# Altium PCB PWB.PcbDoc (part 5 of 5)
Units mm, origin at the board's own origin, x right, y up, seen from the top; angles counter-clockwise.
Board outline 202 x 125 mm, 2 copper layers (Top Layer, Bottom Layer), stack 1.576 mm thick; 208 components, 124 nets, 630 pads, 5440 vias.
Unrouted connection lines stored in the file: 98.
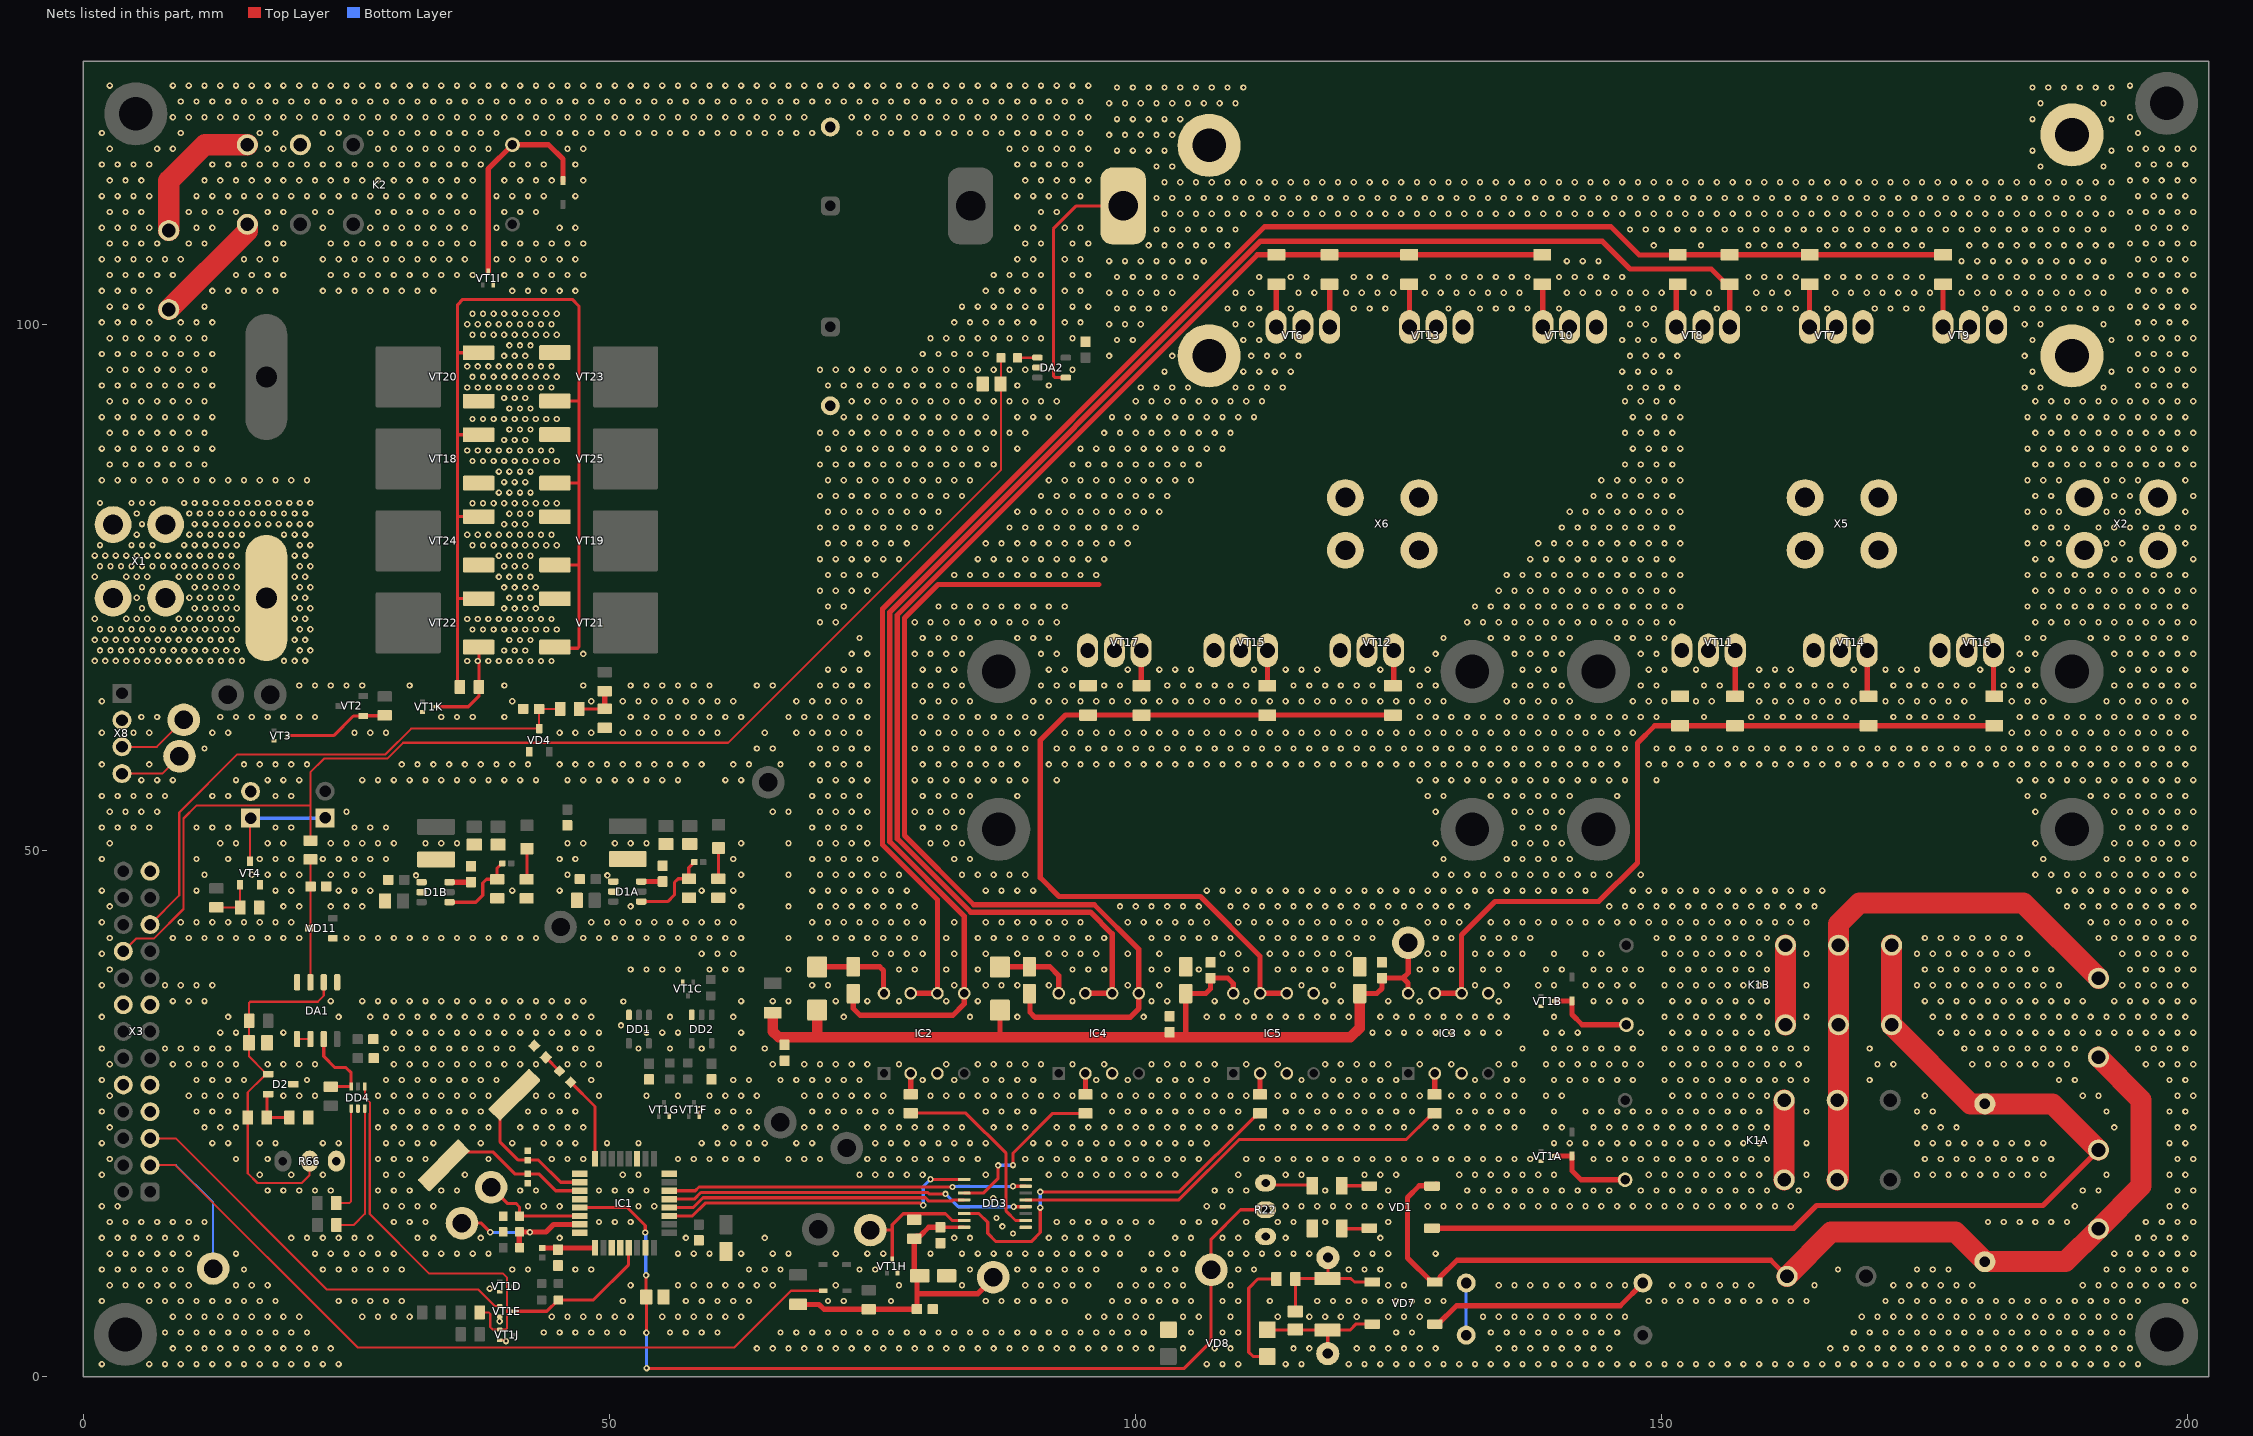
[diagram p4: the nets of this part, all layers, seen from the top]

## Via types
v1: diameter 0.6, hole 0.3, Top Layer to Bottom Layer, tented both sides, 5432 vias
v2: diameter 0.8, hole 0.4, Top Layer to Bottom Layer, tented both sides, 8 vias

## Nets (pads, with @x,y where several pads share a name; then routed paths per layer and width w, separated by ;. In a path a pad name is that pad's centre, name@x,y a point inside that pad or via, vN(x,y) a via of type N, cw(c..) or ccw(c..) an arc to the next point about the centre after c; other vN are vias at no path point) (continued)
GND: (continued)
  other v1: 94.022,101.68 95.522,101.68 194.522,101.68 196.022,101.68 197.522,101.68 199.022,101.68 200.522,101.68 1.772,103.18 3.272,103.18 4.772,103.18 6.272,103.18 12.272,103.18 13.772,103.18 15.272,103.18 16.772,103.18 18.272,103.18 22.772,103.18 24.272,103.18 25.772,103.18 27.272,103.18 28.772,103.18 30.272,103.18 31.772,103.18 33.272,103.18 40.772,103.18 42.272,103.18 43.772,103.18 45.272,103.18 46.772,103.18 85.772,103.18 87.272,103.18 88.772,103.18 90.272,103.18 93.272,103.18 94.772,103.18 195.272,103.18 196.772,103.18 198.272,103.18 199.772,103.18 2.522,104.68 4.022,104.68 5.522,104.68 7.022,104.68 8.522,104.68 14.522,104.68 16.022,104.68 17.522,104.68 19.022,104.68 23.522,104.68 25.022,104.68 26.522,104.68 28.022,104.68 29.522,104.68 31.022,104.68 32.522,104.68 34.022,104.68 35.522,104.68 37.022,104.68 40.022,104.68 41.522,104.68 43.022,104.68 44.522,104.68 46.022,104.68 47.522,104.68 86.522,104.68 88.022,104.68 89.522,104.68 91.022,104.68 94.022,104.68 95.522,104.68 194.522,104.68 196.022,104.68 197.522,104.68 199.022,104.68 200.522,104.68 1.772,106.18 3.272,106.18 4.772,106.18 6.272,106.18 7.772,106.18 9.272,106.18 15.272,106.18 16.772,106.18 18.272,106.18 22.772,106.18 24.272,106.18 25.772,106.18 27.272,106.18 28.772,106.18 30.272,106.18 31.772,106.18 33.272,106.18 34.772,106.18 36.272,106.18 39.272,106.18 40.772,106.18 42.272,106.18 43.772,106.18 45.272,106.18 46.772,106.18 88.772,106.18 90.272,106.18 93.272,106.18 94.772,106.18 195.272,106.18 196.772,106.18 198.272,106.18 199.772,106.18 2.522,107.68 4.022,107.68 5.522,107.68 7.022,107.68 10.022,107.68 11.522,107.68 17.522,107.68 19.022,107.68 23.522,107.68 25.022,107.68 26.522,107.68 28.022,107.68 29.522,107.68 31.022,107.68 32.522,107.68 34.022,107.68 35.522,107.68 37.022,107.68 40.022,107.68 41.522,107.68 43.022,107.68 44.522,107.68 46.022,107.68 47.522,107.68 89.522,107.68 91.022,107.68 94.022,107.68 95.522,107.68 194.522,107.68 196.022,107.68 197.522,107.68 199.022,107.68 200.522,107.68 1.772,109.18 3.272,109.18 4.772,109.18 6.272,109.18 10.772,109.18 12.272,109.18 18.272,109.18 22.772,109.18 27.272,109.18 28.772,109.18 30.272,109.18 31.772,109.18 33.272,109.18 34.772,109.18 36.272,109.18 39.272,109.18 45.272,109.18 46.772,109.18 88.772,109.18 90.272,109.18 93.272,109.18 94.772,109.18 195.272,109.18 196.772,109.18 198.272,109.18 199.772,109.18 2.522,110.68 4.022,110.68 5.522,110.68 10.022,110.68 11.522,110.68 13.022,110.68 14.522,110.68 17.522,110.68 19.022,110.68 22.022,110.68 23.522,110.68 28.022,110.68 29.522,110.68 31.022,110.68 32.522,110.68 34.022,110.68 35.522,110.68 37.022,110.68 40.022,110.68 41.522,110.68 43.022,110.68 91.022,110.68 92.522,110.68 194.522,110.68 196.022,110.68 197.522,110.68 199.022,110.68 200.522,110.68 1.772,112.18 3.272,112.18 4.772,112.18 6.272,112.18 10.772,112.18 12.272,112.18 13.772,112.18 15.272,112.18 16.772,112.18 18.272,112.18 19.772,112.18 21.272,112.18 22.772,112.18 24.272,112.18 25.772,112.18 27.272,112.18 28.772,112.18 30.272,112.18 31.772,112.18 33.272,112.18 34.772,112.18 36.272,112.18 39.272,112.18 40.772,112.18 42.272,112.18 43.772,112.18 46.772,112.18 88.772,112.18 90.272,112.18 91.772,112.18 93.272,112.18 94.772,112.18 195.272,112.18 196.772,112.18 198.272,112.18 199.772,112.18 2.522,113.68 4.022,113.68 5.522,113.68 11.522,113.68 13.022,113.68 14.522,113.68 16.022,113.68 17.522,113.68 19.022,113.68 20.522,113.68 22.022,113.68 23.522,113.68 25.022,113.68 26.522,113.68 28.022,113.68 29.522,113.68 31.022,113.68 32.522,113.68 34.022,113.68 35.522,113.68 37.022,113.68 40.022,113.68 41.522,113.68 43.022,113.68 44.522,113.68 47.522,113.68 89.522,113.68 91.022,113.68 92.522,113.68 94.022,113.68 95.522,113.68 194.522,113.68 196.022,113.68 197.522,113.68 199.022,113.68 200.522,113.68 1.772,115.18 3.272,115.18 4.772,115.18 6.272,115.18 12.272,115.18 13.772,115.18 15.272,115.18 16.772,115.18 18.272,115.18 19.772,115.18 21.272,115.18 22.772,115.18 24.272,115.18 25.772,115.18 27.272,115.18 28.772,115.18 30.272,115.18 31.772,115.18 33.272,115.18 34.772,115.18 36.272,115.18 37.772,115.18 40.772,115.18 42.272,115.18 43.772,115.18 46.772,115.18 88.772,115.18 90.272,115.18 91.772,115.18 93.272,115.18 94.772,115.18 195.272,115.18 196.772,115.18 198.272,115.18 199.772,115.18 2.522,116.68 7.022,116.68 8.522,116.68 17.522,116.68 19.022,116.68 23.522,116.68 28.022,116.68 29.522,116.68 31.022,116.68 32.522,116.68 34.022,116.68 35.522,116.68 37.022,116.68 38.522,116.68 46.022,116.68 47.522,116.68 88.022,116.68 89.522,116.68 91.022,116.68 92.522,116.68 94.022,116.68 95.522,116.68 194.522,116.68 196.022,116.68 197.522,116.68 199.022,116.68 200.522,116.68 1.772,118.18 9.272,118.18 16.772,118.18 18.272,118.18 22.772,118.18 24.272,118.18 27.272,118.18 28.772,118.18 30.272,118.18 31.772,118.18 33.272,118.18 34.772,118.18 36.272,118.18 37.772,118.18 39.272,118.18 42.272,118.18 43.772,118.18 45.272,118.18 46.772,118.18 48.272,118.18 49.772,118.18 51.272,118.18 52.772,118.18 54.272,118.18 55.772,118.18 57.272,118.18 58.772,118.18 60.272,118.18 61.772,118.18 63.272,118.18 64.772,118.18 66.272,118.18 67.772,118.18 69.272,118.18 73.772,118.18 75.272,118.18 76.772,118.18 78.272,118.18 79.772,118.18 81.272,118.18 82.772,118.18 84.272,118.18 85.772,118.18 87.272,118.18 88.772,118.18 90.272,118.18 91.772,118.18 93.272,118.18 94.772,118.18 195.272,118.18 8.522,119.68 10.022,119.68 11.522,119.68 13.022,119.68 14.522,119.68 16.022,119.68 17.522,119.68 19.022,119.68 20.522,119.68 22.022,119.68 23.522,119.68 25.022,119.68 26.522,119.68 28.022,119.68 29.522,119.68 31.022,119.68 32.522,119.68 34.022,119.68 35.522,119.68 37.022,119.68 38.522,119.68 40.022,119.68 41.522,119.68 43.022,119.68 44.522,119.68 46.022,119.68 47.522,119.68 49.022,119.68 50.522,119.68 52.022,119.68 53.522,119.68 55.022,119.68 56.522,119.68 58.022,119.68 59.522,119.68 61.022,119.68 62.522,119.68 64.022,119.68 65.522,119.68 67.022,119.68 68.522,119.68 73.022,119.68 74.522,119.68 76.022,119.68 77.522,119.68 79.022,119.68 80.522,119.68 82.022,119.68 83.522,119.68 85.022,119.68 86.522,119.68 88.022,119.68 89.522,119.68 91.022,119.68 92.522,119.68 94.022,119.68 95.522,119.68 194.522,119.68 9.272,121.18 10.772,121.18 12.272,121.18 13.772,121.18 15.272,121.18 16.772,121.18 18.272,121.18 19.772,121.18 21.272,121.18 22.772,121.18 24.272,121.18 25.772,121.18 27.272,121.18 28.772,121.18 30.272,121.18 31.772,121.18 33.272,121.18 34.772,121.18 36.272,121.18 37.772,121.18 39.272,121.18 40.772,121.18 42.272,121.18 43.772,121.18 45.272,121.18 46.772,121.18 48.272,121.18 49.772,121.18 51.272,121.18 52.772,121.18 54.272,121.18 55.772,121.18 57.272,121.18 58.772,121.18 60.272,121.18 61.772,121.18 63.272,121.18 64.772,121.18 66.272,121.18 67.772,121.18 69.272,121.18 70.772,121.18 72.272,121.18 73.772,121.18 75.272,121.18 76.772,121.18 78.272,121.18 79.772,121.18 81.272,121.18 82.772,121.18 84.272,121.18 85.772,121.18 87.272,121.18 88.772,121.18 90.272,121.18 91.772,121.18 93.272,121.18 94.772,121.18 2.522,122.68 8.522,122.68 10.022,122.68 11.522,122.68 13.022,122.68 14.522,122.68 16.022,122.68 17.522,122.68 19.022,122.68 20.522,122.68 22.022,122.68 23.522,122.68 25.022,122.68 26.522,122.68 28.022,122.68 29.522,122.68 31.022,122.68 32.522,122.68 34.022,122.68 35.522,122.68 37.022,122.68 38.522,122.68 40.022,122.68 41.522,122.68 43.022,122.68 44.522,122.68 46.022,122.68 47.522,122.68 49.022,122.68 50.522,122.68 52.022,122.68 53.522,122.68 55.022,122.68 56.522,122.68 58.022,122.68 59.522,122.68 61.022,122.68 62.522,122.68 64.022,122.68 65.522,122.68 67.022,122.68 68.522,122.68 70.022,122.68 71.522,122.68 73.022,122.68 74.522,122.68 76.022,122.68 77.522,122.68 79.022,122.68 80.522,122.68 82.022,122.68 83.522,122.68 85.022,122.68 86.522,122.68 88.022,122.68 89.522,122.68 91.022,122.68 92.522,122.68 94.022,122.68 95.522,122.68 194.522,122.68
NetC6A_1: C6A.1 D1A.2 L1A.1
NetC6A_2: C6A.2 D1A.6 | length 2
  Top Layer w0.3: D1A.6@53.028,47.036 D1A.6@53.033,47.041 ; C6A.2@55.068,47.041 C6A.2@55.073,47.046
  Top Layer w0.5: D1A.6@53.033,47.041 C6A.2@55.068,47.041
NetC6B_1: C6B.1 D1B.2 L1B.1
NetC6B_2: C6B.2 D1B.6 | length 2
  Top Layer w0.3: D1B.6@34.81,46.981 D1B.6@34.815,46.986 ; C6B.2@36.85,46.986 C6B.2@36.855,46.991
  Top Layer w0.5: D1B.6@34.815,46.986 C6B.2@36.85,46.986
NetC9_2: C9.2 IC1.10 ZQ1.2 | length 14.2
  Top Layer w0.3: ZQ1.2@40.976,26.778 39.597,25.399 39.597,22.328 41.359,20.566 43.264,20.566 45.371,18.459 IC1.10@47.197,18.459
NetC10_1: C10.1 IC1.11 ZQ1.1 | length 15
  Top Layer w0.3: ZQ1.1@34.259,20.06 35.553,21.354 38.92,21.354 41.013,19.261 C10.1@42.24,19.261 43.299,19.261 44.901,17.659 IC1.11@47.197,17.659
NetC11_1: C11.1 FB1.2 IC1.17 | length 4.8
  Top Layer w0.5: FB1.2@43.786,12.212 45.11,12.212 IC1.17@48.625,12.212
NetC22_1: C22.1 IC2.8 VD5.CA | length 8.6
  Top Layer w0.5: VD5.CA@69.748,38.918 69.773,38.943 C22.1@73.177,38.943 75.687,38.943 76.048,38.583 76.048,36.474 IC2.8@76.098,36.424
NetC22_2: C22.2 IC2.5 R41.1 VT7.3 VT8.3 VT9.3 VT11.2 VT14.2 VT16.2 X5.1 | length 153
  Top Layer w0.5: C22.2@73.177,36.393 73.177,34.976 73.812,34.341 82.652,34.341 83.718,35.408 IC2.5@83.718,36.424 83.718,43.766 76.654,50.83 76.654,72.668 111.886,107.899 144.348,107.899 146.99,105.258 154.713,105.258 156.164,103.807 R41.1@156.464,103.807 156.468,103.803 VT8.3@156.468,99.746
NetC25_1: C25.1 IC4.8 VD6.CA | length 7.6
  Top Layer w0.5: VD6.CA@87.122,38.918 87.147,38.943 C25.1@89.916,38.943 91.867,38.943 92.702,38.108 IC4.8@92.702,36.424
NetC25_2: C25.2 IC4.5 R37.1 VT6.3 VT10.3 VT12.2 VT13.3 VT15.2 VT17.2 X6.1 | length 89.6
  Top Layer w0.5: C25.2@89.916,36.393 89.967,36.342 89.967,34.62 90.449,34.138 99.492,34.138 100.322,34.967 IC4.5@100.322,36.424 100.322,40.598 96.088,44.831 84.633,44.831 78.054,51.41 78.054,72.088 81.227,75.26 96.52,75.26 ; R37.1@118.44,103.807 118.452,103.795 VT6.3@118.452,99.746
NetC31_1: C31.1 R60.1 TP1.1 VD7.3 VD10.CA | length 12.6
  Top Layer w0.3: C31.1@115.189,6.184 115.2,6.195 R60.1@115.2,9.271 115.237,9.308 VD10.CA@118.242,9.308 ; TP1.1@118.288,11.303 118.288,9.354 VD10.CA@118.242,9.308 ; VD7.3@122.501,8.985 120.809,8.985 120.486,9.308 VD10.CA@118.242,9.308
NetC31_2: C31.2 TP2.1 VD7.4 VD8.2 VD10.AN | length 12.5
  Top Layer w0.3: VD8.2@112.523,4.445 112.56,4.408 VD10.AN@118.242,4.408 ; TP2.1@118.273,2.181 118.273,4.377 VD10.AN@118.242,4.408 ; VD7.4@122.501,4.985 122.482,5.004 120.98,5.004 120.384,4.408 VD10.AN@118.242,4.408
NetC37_1: C37.1 DA1.3 R18.1 VD11.3 | length 11.7
  Top Layer w0.2: R18.1@21.59,49.138 21.596,49.132 21.596,46.59 C37.1@21.602,46.584 21.596,46.578 21.596,43.575 21.59,43.569 21.59,41.762 21.59,40.975 21.59,37.998 21.641,37.948 DA1.3@21.641,37.473
NetD1A_4: D1A.4 R6A.1 R8.1 | length 8.1
  Top Layer w0.3: D1A.4@53.028,45.136 55.537,45.136 56.191,45.789 56.191,46.958 56.546,47.313 57.548,47.313 57.544,47.318 57.544,48.368 57.921,48.745 R8.1@57.921,48.77 ; R8.1@57.921,48.77 R8.1@58.046,48.895 ; R8.1@57.921,48.77 R8.1@58.046,48.895 ; R8.1@58.046,48.895 R8.1@58.071,48.895 R8.1@58.046,48.895
NetD1B_4: D1B.4 R5.1 R6B.1 | length 7.9
  Top Layer w0.3: D1B.4@34.81,45.081 37.32,45.081 37.973,45.734 37.973,46.902 38.329,47.258 39.33,47.258 39.326,47.262 39.326,48.312 39.703,48.69 39.703,48.715 39.828,48.84 R5.1@39.853,48.84
NetD2_2: D2.2 R20.2 R31.1 | length 4.6
  Top Layer w0.3: D2.2@17.571,26.838 17.458,26.725 17.458,24.763 17.308,24.613 17.458,24.613 R31.1@19.598,24.613
NetDA1_5: DA1.5 DA1.6 | length 1.3
  Top Layer w0.2: DA1.5@20.32,32.073 DA1.6@21.59,32.073
NetDA1_7: DA1.7 DD4.6 R16.2 | length 8.1
  Top Layer w0.3: DA1.7@22.86,32.073 22.86,30.429 23.927,29.362 24.968,29.362 25.461,28.869 DD4.6@25.461,27.568 25.45,27.556 23.532,27.556 R16.2@23.52,27.545
NetDA2_1: DA2.1 R43.1 | length 1.9
  Top Layer w0.2: R43.1@88.804,96.817 DA2.1@90.66,96.817
  Top Layer w0.3: R43.1@88.791,96.805 R43.1@88.786,96.799 R43.1@88.804,96.817 ; DA2.1@90.66,96.817 DA2.1@90.678,96.835
NetDA2_4: DA2.4 pad.0@107,97 pad.0@107,117 pad.0@189,97 pad.0@189,118 SH1.2 VT6.2 VT7.2 VT8.2 VT9.2 VT10.2 VT13.2 | length 22.7
  Top Layer w0.3: DA2.4@93.378,94.935 92.378,94.935 92.202,95.111 92.202,109.068 94.386,111.252 SH1.2@98.828,111.252
  other v1: 100.5,94 102,94 103.5,94 105,94 109.5,94 111,94 112.5,94 114,94 147,94 148.5,94 150,94 151.5,94 184.5,94 186,94 192,94 102.75,95.5 110.25,95.5 111.75,95.5 113.25,95.5 114.75,95.5 146.25,95.5 147.75,95.5 149.25,95.5 150.75,95.5 185.25,95.5 192.75,95.5 97.5,97 103.5,97 111,97 112.5,97 114,97 115.5,97 147,97 148.5,97 150,97 151.5,97 184.5,97 98.25,98.5 99.75,98.5 110.25,98.5 111.75,98.5 146.25,98.5 147.75,98.5 149.25,98.5 185.25,98.5 192.75,98.5 97.5,100 99,100 100.5,100 109.5,100 111,100 147,100 148.5,100 184.5,100 186,100 192,100 98.25,101.5 99.75,101.5 101.25,101.5 102.75,101.5 108.75,101.5 110.25,101.5 111.75,101.5 114.75,101.5 120.75,101.5 122.25,101.5 123.75,101.5 129.75,101.5 132.75,101.5 134.25,101.5 135.75,101.5 137.25,101.5 140.25,101.5 146.25,101.5 147.75,101.5 149.25,101.5 155.25,101.5 158.25,101.5 159.75,101.5 161.25,101.5 162.75,101.5 165.75,101.5 170.25,101.5 171.75,101.5 173.25,101.5 174.75,101.5 180.75,101.5 183.75,101.5 185.25,101.5 186.75,101.5 188.25,101.5 189.75,101.5 191.25,101.5 192.75,101.5 97.5,103 99,103 100.5,103 102,103 103.5,103 109.5,103 111,103 115.5,103 117,103 120,103 121.5,103 123,103 124.5,103 127.5,103 129,103 130.5,103 132,103 133.5,103 135,103 136.5,103 141,103 142.5,103 144,103 145.5,103 147,103 148.5,103 150,103 153,103 154.5,103 159,103 160.5,103 162,103 166.5,103 168,103 169.5,103 171,103 172.5,103 174,103 175.5,103 178.5,103 180,103 181.5,103 183,103 184.5,103 186,103 187.5,103 189,103 190.5,103 192,103 98.25,104.5 99.75,104.5 101.25,104.5 102.75,104.5 104.25,104.5 105.75,104.5 111.75,104.5 114.75,104.5 116.25,104.5 120.75,104.5 122.25,104.5 123.75,104.5 128.25,104.5 129.75,104.5 131.25,104.5 132.75,104.5 134.25,104.5 135.75,104.5 137.25,104.5 140.25,104.5 141.75,104.5 143.25,104.5 144.75,104.5 146.25,104.5 158.25,104.5 159.75,104.5 161.25,104.5 162.75,104.5 165.75,104.5 167.25,104.5 168.75,104.5 170.25,104.5 171.75,104.5 173.25,104.5 174.75,104.5 179.25,104.5 180.75,104.5 182.25,104.5 183.75,104.5 185.25,104.5 186.75,104.5 188.25,104.5 189.75,104.5 191.25,104.5 192.75,104.5 97.5,106 99,106 100.5,106 102,106 103.5,106 105,106 106.5,106 141,106 142.5,106 144,106 178.5,106 180,106 181.5,106 183,106 184.5,106 186,106 187.5,106 189,106 190.5,106 192,106 101.25,107.5 102.75,107.5 104.25,107.5 105.75,107.5 107.25,107.5 108.75,107.5 149.25,107.5 153.75,107.5 158.25,107.5 159.75,107.5 161.25,107.5 162.75,107.5 165.75,107.5 167.25,107.5 168.75,107.5 170.25,107.5 171.75,107.5 173.25,107.5 174.75,107.5 179.25,107.5 180.75,107.5 182.25,107.5 183.75,107.5 185.25,107.5 186.75,107.5 188.25,107.5 189.75,107.5 191.25,107.5 192.75,107.5 102,109 103.5,109 105,109 106.5,109 108,109 109.5,109 147,109 148.5,109 150,109 151.5,109 153,109 154.5,109 156,109 157.5,109 159,109 160.5,109 162,109 163.5,109 165,109 166.5,109 168,109 169.5,109 171,109 172.5,109 174,109 175.5,109 177,109 178.5,109 180,109 181.5,109 183,109 184.5,109 186,109 187.5,109 189,109 190.5,109 192,109 102.75,110.5 104.25,110.5 105.75,110.5 107.25,110.5 108.75,110.5 110.25,110.5 111.75,110.5 113.25,110.5 114.75,110.5 116.25,110.5 117.75,110.5 119.25,110.5 120.75,110.5 122.25,110.5 123.75,110.5 125.25,110.5 126.75,110.5 128.25,110.5 129.75,110.5 131.25,110.5 132.75,110.5 134.25,110.5 135.75,110.5 137.25,110.5 138.75,110.5 140.25,110.5 141.75,110.5 143.25,110.5 144.75,110.5 146.25,110.5 147.75,110.5 149.25,110.5 150.75,110.5 152.25,110.5 153.75,110.5 155.25,110.5 156.75,110.5 158.25,110.5 159.75,110.5 161.25,110.5 162.75,110.5 164.25,110.5 165.75,110.5 167.25,110.5 168.75,110.5 170.25,110.5 171.75,110.5 173.25,110.5 174.75,110.5 176.25,110.5 177.75,110.5 179.25,110.5 180.75,110.5 182.25,110.5 183.75,110.5 185.25,110.5 186.75,110.5 188.25,110.5 189.75,110.5 191.25,110.5 192.75,110.5 102,112 103.5,112 105,112 106.5,112 108,112 109.5,112 111,112 112.5,112 114,112 115.5,112 117,112 118.5,112 120,112 121.5,112 123,112 124.5,112 126,112 127.5,112 129,112 130.5,112 132,112 133.5,112 135,112 136.5,112 138,112 139.5,112 141,112 142.5,112 144,112 145.5,112 147,112 148.5,112 150,112 151.5,112 153,112 154.5,112 156,112 157.5,112 159,112 160.5,112 162,112 163.5,112 165,112 166.5,112 168,112 169.5,112 171,112 172.5,112 174,112 175.5,112 177,112 178.5,112 180,112 181.5,112 183,112 184.5,112 186,112 187.5,112 189,112 190.5,112 192,112 102.75,113.5 104.25,113.5 105.75,113.5 107.25,113.5 108.75,113.5 110.25,113.5 111.75,113.5 113.25,113.5 114.75,113.5 116.25,113.5 117.75,113.5 119.25,113.5 120.75,113.5 122.25,113.5 123.75,113.5 125.25,113.5 126.75,113.5 128.25,113.5 129.75,113.5 131.25,113.5 132.75,113.5 134.25,113.5 135.75,113.5 137.25,113.5 138.75,113.5 140.25,113.5 141.75,113.5 143.25,113.5 144.75,113.5 146.25,113.5 147.75,113.5 149.25,113.5 150.75,113.5 152.25,113.5 153.75,113.5 155.25,113.5 156.75,113.5 158.25,113.5 159.75,113.5 161.25,113.5 162.75,113.5 164.25,113.5 165.75,113.5 167.25,113.5 168.75,113.5 170.25,113.5 171.75,113.5 173.25,113.5 174.75,113.5 176.25,113.5 177.75,113.5 179.25,113.5 180.75,113.5 182.25,113.5 183.75,113.5 185.25,113.5 186.75,113.5 188.25,113.5 189.75,113.5 191.25,113.5 192.75,113.5 102,115 103.5,115 186,115 192,115 98.25,116.5 99.75,116.5 101.25,116.5 102.75,116.5 185.25,116.5 192.75,116.5 97.5,118 99,118 100.5,118 102,118 103.5,118 98.25,119.5 99.75,119.5 101.25,119.5 102.75,119.5 104.25,119.5 185.25,119.5 192.75,119.5 97.5,121 99,121 100.5,121 102,121 103.5,121 105,121 106.5,121 108,121 109.5,121 186,121 192,121 98.25,122.5 99.75,122.5 101.25,122.5 102.75,122.5 104.25,122.5 105.75,122.5 107.25,122.5 108.75,122.5 110.25,122.5 185.25,122.5 186.75,122.5 188.25,122.5 189.75,122.5 191.25,122.5 192.75,122.5
NetDD3_2: DD3.2 R27.1 | length 18.4
  Top Layer w0.3: R27.1@78.638,25.033 83.882,25.033 87.706,21.209 87.706,15.723 88.595,14.834 DD3.2@89.564,14.834
NetDD3_4: DD3.4 IC1.29 | length 34.7
  Top Layer w0.3: IC1.29@55.673,16.859 58.072,16.859 58.698,17.485 80.255,17.485 80.381,17.359 v1(81.94,17.359) ; v1(88.417,16.129) 88.423,16.134 DD3.4@89.564,16.134
  Bottom Layer w0.3: v1(81.94,17.359) 83.17,16.129 v1(88.417,16.129)
NetDD3_5: DD3.5 R28.1 | length 42.3
  Top Layer w0.3: DD3.5@89.564,16.784 104.105,16.784 109.851,22.53 125.73,22.53 127.858,24.658 128.072,24.658 R28.1@128.422,25.008
NetDD3_7: DD3.7 IC1.30 | length 34.1
  Top Layer w0.3: IC1.30@55.673,17.659 58.165,17.659 58.515,18.009 v1(82.614,18.009) ; v1(88.356,18.084) DD3.7@89.564,18.084
  Bottom Layer w0.3: v1(82.614,18.009) 82.652,18.046 88.318,18.046 v1(88.356,18.084)
NetDD3_9: DD3.9 IC1.27 | length 30.7
  Top Layer w0.3: IC1.27@55.673,15.259 57.887,15.259 59.112,16.485 79.548,16.485 79.751,16.281 v1(79.832,16.281) ; v1@80.529,18.734 DD3.9@83.714,18.734
  Bottom Layer w0.3: v1(79.832,16.281) 79.832,18.059 v1(80.518,18.745)
NetDD3_11: DD3.11 R29.1 | length 16.1
  Top Layer w0.3: DD3.11@83.714,17.434 85.532,17.434 86.944,18.847 v1(86.944,20.066) ; v1(88.356,20.091) 88.356,21.224 92.14,25.008 R29.1@95.25,25.008
  Bottom Layer w0.3: v1(86.944,20.066) 86.957,20.079 88.343,20.079 v1(88.356,20.091)
NetDD3_12: DD3.12 IC1.28 | length 28.6
  Top Layer w0.3: IC1.28@55.673,16.059 57.979,16.059 58.905,16.985 80.048,16.985 80.36,16.673 82.539,16.673 82.65,16.784 DD3.12@83.714,16.784
NetDD3_14: DD3.14 R30.1 | length 37.1
  Top Layer w0.3: DD3.14@83.714,15.484 85.125,15.484 85.954,14.656 85.954,13.614 86.741,12.827 90.094,12.827 90.957,13.691 v1(90.957,16.053) ; v1(90.957,17.551) 104.165,17.551 111.272,24.658 111.486,24.658 R30.1@111.836,25.008
  Bottom Layer w0.3: v1(90.957,16.053) v1(90.957,17.551)
NetDD3_15: DD3.15 FP14.1 R58.1 VT1H.3 | length 12.9
  Top Layer w0.3: FP14.1@74.803,13.919 76.79,13.919 76.891,14.021 ; VT1H.3@76.886,11.14 76.891,11.146 76.891,14.021 ; DD3.15@83.714,14.834 82.576,14.834 81.94,15.469 77.927,15.469 76.891,14.433 76.891,14.021
NetDD4_1: DD4.1 R33.1 | length 10.3
  Top Layer w0.2: R33.1@24.039,16.485 25.285,16.485 25.461,16.66 DD4.1@25.461,25.468
NetDD4_3: DD4.3 R32.1 | length 13.1
  Top Layer w0.2: R32.1@24.065,14.402 25.705,14.402 26.761,15.458 DD4.3@26.761,25.468
NetDD4_4: DD4.4 R59.1 VT1J.1 | length 36.7
  Top Layer w0.2: DD4.4@26.761,27.568 26.761,26.528 27.236,26.053 27.236,25.019 27.229,25.012 27.229,15.443 32.893,9.779 39.903,9.779 40.259,9.423 40.259,4.58 40.142,4.462 VT1J.1@39.584,4.462 39.004,4.462 cw(c39.004,4.662) 38.862,4.521 38.684,4.699 38.684,5.944 38.532,6.096 R59.1@37.679,6.096
NetF1_1: F1.1 X1.1
  other v1: 1.088,68.012 2.088,68.012 3.088,68.012 4.088,68.012 5.088,68.012 6.088,68.012 7.088,68.012 8.088,68.012 9.088,68.012 10.088,68.012 11.088,68.012 12.088,68.012 13.088,68.012 14.088,68.012 15.088,68.012 19.088,68.012 20.088,68.012 21.088,68.012 1.588,69.012 2.588,69.012 3.588,69.012 4.588,69.012 5.588,69.012 6.588,69.012 7.588,69.012 8.588,69.012 9.588,69.012 10.588,69.012 11.588,69.012 12.588,69.012 13.588,69.012 14.588,69.012 20.588,69.012 21.588,69.012 1.088,70.012 2.088,70.012 3.088,70.012 4.088,70.012 5.088,70.012 6.088,70.012 7.088,70.012 8.088,70.012 9.088,70.012 10.088,70.012 11.088,70.012 12.088,70.012 13.088,70.012 14.088,70.012 20.088,70.012 21.088,70.012 1.588,71.012 2.588,71.012 3.588,71.012 4.588,71.012 5.588,71.012 6.588,71.012 7.588,71.012 8.588,71.012 9.588,71.012 10.588,71.012 11.588,71.012 12.588,71.012 13.588,71.012 14.588,71.012 20.588,71.012 21.588,71.012 1.088,72.012 4.088,72.012 5.088,72.012 6.088,72.012 9.088,72.012 10.088,72.012 11.088,72.012 12.088,72.012 13.088,72.012 14.088,72.012 20.088,72.012 21.088,72.012 5.588,73.012 10.588,73.012 11.588,73.012 12.588,73.012 13.588,73.012 14.588,73.012 20.588,73.012 21.588,73.012 5.088,74.012 10.088,74.012 11.088,74.012 12.088,74.012 13.088,74.012 14.088,74.012 20.088,74.012 21.088,74.012 5.588,75.012 10.588,75.012 11.588,75.012 12.588,75.012 13.588,75.012 14.588,75.012 20.588,75.012 21.588,75.012 1.088,76.012 4.088,76.012 5.088,76.012 6.088,76.012 9.088,76.012 10.088,76.012 11.088,76.012 12.088,76.012 13.088,76.012 14.088,76.012 20.088,76.012 21.088,76.012 1.588,77.012 2.588,77.012 3.588,77.012 4.588,77.012 5.588,77.012 6.588,77.012 7.588,77.012 8.588,77.012 9.588,77.012 10.588,77.012 11.588,77.012 12.588,77.012 13.588,77.012 14.588,77.012 20.588,77.012 21.588,77.012 1.088,78.012 2.088,78.012 3.088,78.012 4.088,78.012 5.088,78.012 6.088,78.012 7.088,78.012 8.088,78.012 9.088,78.012 10.088,78.012 11.088,78.012 12.088,78.012 13.088,78.012 14.088,78.012 20.088,78.012 21.088,78.012 1.588,79.012 4.588,79.012 5.588,79.012 6.588,79.012 9.588,79.012 10.588,79.012 11.588,79.012 12.588,79.012 13.588,79.012 14.588,79.012 20.588,79.012 21.588,79.012 5.088,80.012 10.088,80.012 11.088,80.012 12.088,80.012 13.088,80.012 14.088,80.012 15.088,80.012 19.088,80.012 20.088,80.012 21.088,80.012 5.588,81.012 10.588,81.012 11.588,81.012 12.588,81.012 13.588,81.012 14.588,81.012 15.588,81.012 16.588,81.012 17.588,81.012 18.588,81.012 19.588,81.012 20.588,81.012 21.588,81.012 5.088,82.012 10.088,82.012 11.088,82.012 12.088,82.012 13.088,82.012 14.088,82.012 15.088,82.012 16.088,82.012 17.088,82.012 18.088,82.012 19.088,82.012 20.088,82.012 21.088,82.012 1.588,83.012 4.588,83.012 5.588,83.012 6.588,83.012 9.588,83.012 10.588,83.012 11.588,83.012 12.588,83.012 13.588,83.012 14.588,83.012 15.588,83.012 16.588,83.012 17.588,83.012 18.588,83.012 19.588,83.012 20.588,83.012 21.588,83.012
NetFP10_1: FP10.1 IC1.14 R24.1 | length 10.1
  Top Layer w0.3: FP10.1@38.76,17.983 40.284,16.459 41.123,16.459 41.466,16.116 R24.1@41.466,15.259 ; R24.1@41.466,15.24 R24.1@41.466,15.259 ; IC1.14@47.197,15.259 R24.1@41.466,15.259
NetFP11_1: FP11.1 IC1.15 R25.1 R26.1 | length 14.4
  Top Layer w0.3: FP11.1@35.992,14.58 37.821,14.58 v1(38.684,13.716)
  Top Layer w0.5: R25.1@41.448,12.116 R26.1@41.448,13.64 ; R26.1@41.466,13.741 43.967,13.741 44.685,14.459 IC1.15@47.197,14.459
  Bottom Layer w0.3: v1@38.684,13.691 38.697,13.703 42.431,13.703 v1(42.443,13.716)
NetFP15_1: FP15.1 X8.3 | length 6.9
  Top Layer w0.2: X8.3@3.683,59.842 6.985,59.842 FP15.1@9.55,62.408
NetFP16_1: FP16.1 X8.4 | length 6.1
  Top Layer w0.2: X8.4@3.683,57.302 7.493,57.302 FP16.1@9.144,58.953
NetHG1A_CA: HG1A.CA R7A.1 | length 2.9
  Top Layer w0.3: R7A.1@60.356,47.299 60.382,47.324 HG1A.CA@60.382,50.229
NetHG1B_CA: HG1B.CA R7B.1 | length 2.9
  Top Layer w0.3: R7B.1@42.139,47.244 42.164,47.269 HG1B.CA@42.164,50.173
NetHG2_AN: HG2.AN IC1.8 | length 8.2
  Top Layer w0.3: HG2.AN@46.327,27.968 48.635,25.66 IC1.8@48.635,20.697
NetHG2_CA: HG2.CA R44.2 | length 1.9
  Top Layer w0.3: R44.2@43.957,30.338 HG2.CA@45.266,29.029
NetIC2_2: IC2.2 R27.2 | length 2
  Top Layer w0.5: R27.2@78.638,26.833 IC2.2@78.638,28.804
NetIC2_6: IC2.6 IC2.7 R38.1 R39.1 R40.1 R41.2 | length 158.2
  Top Layer w0.5: IC2.7@78.638,36.424 IC2.6@81.178,36.424 81.178,45.316 75.954,50.54 75.954,72.958 112.267,109.271 145.186,109.271 147.879,106.578 151.508,106.578 R39.1@151.536,106.607 R40.1@176.759,106.607
NetIC3_2: IC3.2 R28.2 | length 2
  Top Layer w0.3: R28.2@128.422,26.706 R28.2@128.448,26.732 ; R28.2@128.422,26.808 R28.2@128.448,26.833
  Top Layer w0.5: R28.2@128.448,26.833 IC3.2@128.448,28.804
NetIC3_6: IC3.6 IC3.7 R45.1 R47.1 R49.1 R51.2 | length 73.6
  Top Layer w0.5: IC3.7@128.448,36.424 IC3.6@130.988,36.424 130.988,41.961 134.163,45.136 144.018,45.136 147.701,48.819 147.701,60.198 149.352,61.849 151.762,61.849 R51.2@151.765,61.846 R45.1@156.972,61.846 R47.1@169.672,61.846 R49.1@181.61,61.846
NetIC4_2: IC4.2 R29.2 | length 2
  Top Layer w0.3: R29.2@95.242,26.816 R29.2@95.25,26.808
  Top Layer w0.5: R29.2@95.242,26.816 IC4.2@95.242,28.804
NetIC4_6: IC4.6 IC4.7 R34.1 R35.1 R36.1 R37.2 | length 129.1
  Top Layer w0.5: IC4.7@95.242,36.424 IC4.6@97.782,36.424 97.782,42.071 95.721,44.131 84.343,44.131 77.354,51.12 77.354,72.378 111.583,106.607 R34.1@113.386,106.607 R36.1@126.009,106.607 R35.1@138.659,106.607
NetIC5_2: IC5.2 R30.2 | length 2
  Top Layer w0.3: R30.2@111.836,26.808 R30.2@111.845,26.816
  Top Layer w0.5: R30.2@111.845,26.816 IC5.2@111.845,28.804
NetIC5_6: IC5.6 IC5.7 R46.1 R48.1 R50.1 R52.2 | length 77.6
  Top Layer w0.5: IC5.6@114.385,36.424 IC5.7@111.845,36.424 111.845,39.946 106.172,45.618 92.735,45.618 90.957,47.396 90.957,60.477 93.342,62.862 R52.2@95.504,62.862 R50.1@100.584,62.862 R48.1@112.522,62.862 R46.1@124.46,62.862
NetK1A_2: K1A.2 VD9A.AN VT1A.3 | length 8.5
  Top Layer w0.5: VT1A.3@139.842,20.955 141.46,20.955 VD9A.AN@141.478,20.973 141.478,19.558 142.337,18.699 K1A.2@146.531,18.699
NetK1A_3: K1A.3 K1A.4 | length 7.6
  Top Layer w2: K1A.4@161.651,18.699 K1A.3@161.651,26.259
NetK1A_5: K1A.5 K1A.6 K1B.5 K1B.6 X4.2 | length 52.8
  Top Layer w2: K1A.6@166.691,18.699 166.818,18.826 166.818,26.259 K1B.6@166.818,33.431 K1B.5@166.818,40.991 166.818,42.993 168.825,45 184.369,45 X4.2@191.516,37.853
NetK1B_2: K1B.2 VD9B.AN VT1B.3 | length 8.5
  Top Layer w0.5: VT1B.3@139.842,35.687 141.46,35.687 VD9B.AN@141.478,35.705 141.478,34.417 142.464,33.431 K1B.2@146.658,33.431
NetK1B_3: K1B.3 K1B.4 | length 7.6
  Top Layer w2: K1B.4@161.778,33.431 K1B.3@161.778,40.991
NetK2_2: K2.2 VD14.AN VT1I.3 | length 20.4
  Top Layer w0.5: VT1I.3@38.481,105.044 38.481,114.751 K2.2@40.794,117.064 44.226,117.064 45.593,115.697 VD14.AN@45.593,113.647
NetK2_7: K2.7 X9.2 | length 11.2
  Top Layer w2: X9.2@8.128,101.406 15.594,108.872 K2.7@15.594,109.504
NetK2_8: K2.8 X9.1 | length 13.6
  Top Layer w2: X9.1@8.128,108.906 8.128,113.64 11.552,117.064 K2.8@15.594,117.064
NetR1_1: R1.1 R2.1 R15.1 | length 4.1
  Top Layer w0.3: R15.1@47.128,63.449 47.131,63.446 R2.1@49.555,63.446
  Top Layer w0.5: R2.1@49.555,63.446 R1.1@49.555,65.14
NetR3_2: R3.2 VT2.1 VT3.3 | length 10
  Top Layer w0.3: VT3.3@19.421,60.909 23.8,60.909 25.669,62.779 VT2.1@26.602,62.779 26.627,62.804 28.626,62.804 R3.2@28.651,62.829
NetR4_1: R4.1 R61.2 VT4.1 | length 4.4
  Top Layer w0.2: R4.1@12.649,44.591 14.892,44.591 14.9,44.583 VT4.1@14.9,46.754
NetR21_1: R21.1 R22.3 | length 4.4
  Top Layer w0.3: R22.3@112.259,18.212 R21.1@116.707,18.212
NetR21_2: R21.2 VD1.3 | length 3
  Top Layer w0.3: R21.2@119.612,18.136 122.002,18.136 122.23,17.907 VD1.3@122.503,17.907
NetR23_2: R23.2 VD1.4 | length 2.6
  Top Layer w0.3: R23.2@119.399,14.046 VD1.4@122.007,14.046
NetR34_2: R34.2 VT6.1 | length 4.1
  Top Layer w0.5: VT6.1@113.372,99.746 113.372,103.793 R34.2@113.386,103.807
NetR35_2: R35.2 VT10.1 | length 4.1
  Top Layer w0.5: R35.2@138.659,103.807 138.716,103.749 VT10.1@138.716,99.746
NetR36_2: R36.2 VT13.1 | length 4.1
  Top Layer w0.5: R36.2@126.009,103.807 126.044,103.772 VT13.1@126.044,99.746
NetR38_2: R38.2 VT7.1 | length 4.1
  Top Layer w0.5: VT7.1@164.06,99.746 164.06,103.783 R38.2@164.084,103.807
NetR39_2: R39.2 VT8.1 | length 4.1
  Top Layer w0.5: VT8.1@151.388,99.746 151.388,103.658 R39.2@151.536,103.807
NetR40_2: R40.2 VT9.1 | length 4.1
  Top Layer w0.5: VT9.1@176.732,99.746 176.732,103.78 R40.2@176.759,103.807
NetR42_1: R42.1 VT1K.3 VT18.1 VT19.1 VT20.1 VT21.1 VT22.1 VT23.1 VT24.1 VT25.1 | length 9.2
  Top Layer w0.3: VT1K.3@33.543,63.652 36.601,63.652 37.603,64.654 R42.1@37.603,65.532 37.603,69.31 VT22.1@37.585,69.328
  other v1: 36.5,68 37.5,68 38.5,68 39.5,68 40.5,68 41.5,68 42.5,68 43.5,68 44.5,68 40,69 41,69 42,69 40.5,70 41.5,70 42.5,70 37,71 38,71 39,71 40,71 41,71 42,71 43,71 44,71 45,71 36.5,72 37.5,72 38.5,72 39.5,72 40.5,72 41.5,72 42.5,72 43.5,72 44.5,72 40,73 41,73 42,73 43,73 40.5,74 41.5,74 42.5,74 40,75 41,75 42,75 43,75 39.5,76 40.5,76 41.5,76 42.5,76 40,77 41,77 42,77 39.5,78 40.5,78 41.5,78 42.5,78 37,79 38,79 39,79 40,79 41,79 42,79 43,79 44,79 45,79 36.5,80 37.5,80 38.5,80 39.5,80 40.5,80 41.5,80 42.5,80 43.5,80 44.5,80 40,81 41,81 42,81 40.5,82 41.5,82 42.5,82 37,83 38,83 39,83 40,83 41,83 42,83 43,83 44,83 45,83 39.5,84 40.5,84 41.5,84 42.5,84 40,85 41,85 42,85 39.5,86 40.5,86 41.5,86 42.5,86 37,87 38,87 39,87 40,87 41,87 42,87 43,87 44,87 45,87 36.5,88 37.5,88 38.5,88 39.5,88 40.5,88 41.5,88 42.5,88 43.5,88 44.5,88 40,89 41,89 42,89 40.5,90 41.5,90 42.5,90 37,91 38,91 39,91 40,91 41,91 42,91 43,91 44,91 45,91 40.5,92 41.5,92 42.5,92 40,93 41,93 42,93 36.5,94 37.5,94 38.5,94 39.5,94 40.5,94 41.5,94 42.5,94 43.5,94 44.5,94 37,95 38,95 39,95 40,95 41,95 42,95 43,95 44,95 45,95 36.5,96 37.5,96 38.5,96 39.5,96 40.5,96 41.5,96 42.5,96 43.5,96 44.5,96 40,97 41,97 42,97 40.5,98 41.5,98 42.5,98 37,99 38,99 39,99 40,99 41,99 42,99 43,99 44,99 45,99 36.5,100 37.5,100 38.5,100 39.5,100 40.5,100 41.5,100 42.5,100 43.5,100 44.5,100 37,101 38,101 39,101 40,101 41,101 42,101 43,101 44,101 45,101
NetR42_2: R42.2 VT18.3 VT19.3 VT20.3 VT21.3 VT22.3 VT23.3 VT24.3 VT25.3 | length 98.2
  Top Layer w0.3: R42.2@35.803,65.532 35.578,65.757 35.578,73.904 ; VT22.3@37.585,73.928 35.602,73.928 35.578,73.904 ; VT24.3@37.585,81.717 35.578,81.717 ; VT18.3@37.585,89.507 35.578,89.507 ; VT20.3@37.585,97.296 35.578,97.296 ; VT21.3@44.831,69.328 44.944,69.215 47,69.215 47.117,69.332 47.117,77.216 ; VT19.3@44.831,77.122 47.023,77.122 47.117,77.216 ; VT25.3@44.831,84.916 47.037,84.916 47.117,84.836 ; VT23.3@44.831,92.71 46.99,92.71 47.117,92.837 ; 35.578,73.904 35.578,81.717 ; 35.578,81.717 35.578,89.507 ; 35.578,89.507 35.578,97.296 ; 35.578,97.296 35.578,101.872 36.068,102.362 46.482,102.362 47.117,101.727 47.117,92.837 ; 47.117,77.216 47.117,84.836 ; 47.117,84.836 47.117,92.837
NetR45_2: R45.2 VT11.1 | length 4.4
  Top Layer w0.5: R45.2@156.972,64.646 157,64.674 VT11.1@157,69
NetR46_2: R46.2 VT12.1 | length 3.4
  Top Layer w0.5: R46.2@124.46,65.662 124.54,65.742 VT12.1@124.54,69
NetR47_2: R47.2 VT14.1 | length 4.4
  Top Layer w0.5: VT14.1@169.54,69 169.54,64.778 R47.2@169.672,64.646
NetR48_2: R48.2 VT15.1 | length 3.3
  Top Layer w0.5: R48.2@112.522,65.662 112.54,65.68 VT15.1@112.54,69
NetR49_2: R49.2 VT16.1 | length 4.4
  Top Layer w0.5: VT16.1@181.54,69 181.54,64.716 R49.2@181.61,64.646
NetR50_2: R50.2 VT17.1 | length 3.4
  Top Layer w0.5: VT17.1@100.54,69 100.54,65.706 R50.2@100.584,65.662
NetR56_2: R56.2 R57.1 | length 5
  Bottom Layer w0.3: R56.2@131.427,3.937 R57.1@131.427,8.89
NetR57_2: R57.2 VD7.1 | length 21.4
  Top Layer w0.5: VD7.1@128.451,4.985 128.751,4.985 130.497,6.731 146.068,6.731 R57.2@148.227,8.89
NetR60_2: R60.2 VD8.1 | length 11
  Top Layer w0.3: VD8.1@112.523,1.905 111.176,1.905 110.769,2.311 110.769,8.407 111.633,9.271 R60.2@113.4,9.271
NetVT4_3: VT4.3 X10.1 X11.1 | length 11.2
  Top Layer w0.2: VT4.3@15.85,48.954 15.85,53.01 X11.1@15.9,53.061
  Bottom Layer w0.2: X10.1@22.962,53.061 X10.1@22.987,53.086
  Bottom Layer w0.3: X11.1@15.9,53.061 X10.1@22.962,53.061
NEUTRAL: C14.2 VD1.2 VD7.2 X4.1 X7.1 X12.1 | length 101.1
  Top Layer w0.3: X7.1@161.901,9.525 X7.1@161.925,9.525
  Top Layer w0.5: VD1.2@128.172,18.103 VD1.2@128.194,18.125 ; VD1.2@128.574,18.303 128.396,18.125 VD1.2@128.194,18.125 ; X7.1@161.901,9.525 160.377,11.049 130.545,11.049 128.951,9.455 128.951,9.185 128.751,8.985 128.151,8.985 125.857,11.279 125.857,17.018 126.964,18.125 VD1.2@128.194,18.125
  Top Layer w2: X7.1@161.925,9.525 166.116,13.716 177.92,13.716 C14.2@180.721,10.915 188.401,10.915 X12.1@191.516,14.03 195.58,18.094 195.58,26.289 X4.1@191.516,30.353
REF: C33.1 D2.1 DA1.2 R19.2 R20.1 R66.2 | length 34.4
  Top Layer w0.2: D2.1@17.248,28.753 17.248,28.615 17.105,28.472 17.098,28.472 15.635,27.01 R20.1@15.635,24.613 15.635,19.315 16.561,18.39 20.752,18.39 21.514,19.152 R66.2@21.514,20.472 ; D2.1@17.571,28.738 17.221,28.738 17.221,28.957 15.748,30.429 15.748,31.852 15.748,33.807 15.748,35.505 15.865,35.622 22.287,35.622 22.86,36.195 DA1.2@22.86,37.473
SST: VT1E.1 X3.5 | length 39.8
  Top Layer w0.2: X3.5@6.35,22.631 8.795,22.631 23.172,8.255 37.567,8.255 39.124,6.698 VT1E.1@39.584,6.698
SST_CTRL: IC1.21 R10.1 VT1E.3 | length 14.4
  Top Layer w0.3: VT1E.3@40.884,6.198 44.057,6.198 45.136,7.277 R10.1@45.161,7.277 48.476,7.277 51.835,10.636 IC1.21@51.835,12.221
TR_OUT_L: C14.1 K1B.7 K1B.8 VD1.1 X12.2 | length 98.6
  Top Layer w0.5: VD1.1@128.172,14.103 162.566,14.103 164.719,16.256 186.242,16.256 X12.2@191.516,21.53
  Top Layer w2: K1B.7@171.858,40.991 K1B.8@171.858,33.431 179.374,25.915 C14.1@180.721,25.915 187.131,25.915 X12.2@191.516,21.53
U_FB: C15.1 FP9.1 IC1.13 R22.2 | length 91.3
  Top Layer w0.3: IC1.13@47.197,16.059 51.708,16.059 53.416,14.351 v1(53.416,13.691) ; v1(53.492,9.627) 53.492,7.582 53.518,7.557 v1(53.518,4.154) ; v1(53.543,0.8) 53.588,0.755 104.59,0.755 107.188,3.353 107.188,13.056 109.982,15.85 R22.2@112.37,15.85
  Bottom Layer w0.3: v1(53.416,13.691) 53.454,13.652 53.454,9.665 v1(53.492,9.627) ; v1(53.518,4.154) 53.531,4.141 53.531,0.813 v1(53.543,0.8)
VCC_DRV: C19.1 C20.1 C21.1 C23.1 C24.1 C26.1 FP12.1 IC3.8 IC5.8 R54.1 VD5.AN VD6.AN | length 88.3
  Top Layer w0.5: C19.1@66.661,31.521 C19.1@66.672,31.509 ; 69.647,32.233 69.748,32.334 ; VD5.AN@69.748,34.818 VD5.AN@69.786,34.781 ; 87.046,32.233 87.122,32.309 VD6.AN@87.122,34.818 ; 104.75,32.233 104.775,32.258 C20.1@104.775,36.393 106.675,36.393 107.137,36.855 C26.1@107.137,37.868 108.766,37.868 109.303,37.331 IC5.8@109.305,36.424 IC5.8@109.305,36.424 ; C21.1@121.31,36.393 122.931,36.393 123.419,36.881 C23.1@123.419,37.868 125.428,37.868 ; IC3.8@125.908,36.424 125.908,37.389 125.428,37.868 ; FP12.1@125.933,41.224 125.933,38.373 125.428,37.868
  Top Layer w1: R54.1@65.507,34.615 65.507,32.818 66.092,32.233 69.647,32.233 87.046,32.233 104.75,32.233 120.421,32.233 121.31,33.122 C21.1@121.31,36.393 ; 69.748,32.334 VD5.AN@69.748,34.818
VCC_LOGIC: C27.1 C28.2 C32.2 DD3.16 FP13.1 R14.1 R53.1 R58.2 | length 31.4
  Top Layer w0.3: R58.2@78.969,13.095 R58.2@79.065,13.192 ; C32.2@81.483,14.187 83.262,14.187 83.264,14.184 DD3.16@83.714,14.184
  Top Layer w0.5: R53.1@67.945,6.855 69.933,6.855 70.398,6.39 R14.1@74.651,6.39 ; R14.1@74.651,6.401 C28.2@78.969,6.401 ; C27.1@78.969,9.576 R58.2@78.969,13.095 ; R58.2@79.065,13.192 79.219,13.345 79.512,13.345 80.354,14.187 C32.2@81.458,14.187 ; C28.2@79.235,6.401 79.235,7.857 ; C27.1@79.497,9.576 79.235,9.313 79.235,7.857 ; FP13.1@86.944,9.169 86.316,9.169 85.004,7.857 79.235,7.857
xMEAS_CURRENT: C18.1 R18.2 R43.2 X3.20 | length 123.3
  Top Layer w0.2: X3.20@3.81,40.411 5.01,41.611 6.707,41.611 9.525,44.429 9.525,53.035 10.75,54.261 21.615,54.261 ; R18.2@21.59,50.938 21.59,54.261 21.59,57.429 22.885,58.725 28.905,58.725 30.408,60.227 61.294,60.227 87.236,86.169 R43.2@87.236,96.799
xMEAS_VBAT: C1.1 R15.2 VD4.3 X3.21 | length 53.2
  Top Layer w0.2: X3.21@6.35,42.951 9.125,45.726 9.125,53.605 14.645,59.125 28.721,59.125 31.174,61.577 VD4.3@43.332,61.577 43.332,63.437 C1.1@43.32,63.449 R15.2@45.328,63.449
сEN_PWM: FP6.1 VD2.CA X3.3 | length 87.1
  Top Layer w0.2: X3.3@6.35,20.091 8.758,20.091 26.087,2.762 61.87,2.762 67.261,8.153 VD2.CA@70.325,8.153
  Bottom Layer w0.2: X3.3@6.35,20.091 8.788,20.091 12.344,16.535 FP6.1@12.344,10.262
pads on no net: DD3.3 DD3.6 DD3.10 DD3.13 IC1.7 IC1.22 IC1.24 IC1.25 IC1.31 IC2.1 IC2.4 IC3.1 IC3.4 IC4.1 IC4.4 IC5.1 IC5.4 K2.3 K2.4 VT6. VT7. VT8. VT9. VT10. VT11. VT12. VT13. VT14. VT15. VT16. VT17.

## Polygon pours and split planes (outlines as drawn)
GND on Top Layer "GND_L-01_P-001" (solid, remove dead copper, pour order 62): 201.983,124.779 201.983,-0.221 -0.017,-0.221 -0.017,124.779
NetDA2_4 on Top Layer "NONET_L-01_P-001" (solid, pour order 61): 96.52,124.46 96.52,93.345 193.675,93.345 193.675,124.46
NetR42_1 on Top Layer "NONET_L-01_P-001" (solid, pour order 53): 36,102 46,102 46,67 36,67
NetC25_2 on Top Layer "NONET_L-01_P-001" (solid, pour order 59): 145.415,99.695 117.094,99.695 117.094,96.139 93.345,72.39 93.345,69.215 127,69.215 145.415,87.63
+V_BRIDGE on Top Layer "NONET_L-01_P-001" (solid, remove dead copper, pour order 51): 48.26,67.31 48.26,117.475 61.722,117.475 85.09,117.475 87.63,114.935 87.63,107.315 76.835,96.52 69.215,96.52 69.215,67.31 60.325,67.31
NetC6A_1 on Top Layer "NONET_L-01_P-001" (solid, pour order 58): 49.923,46.374 50.958,46.374 51.162,46.577 51.162,47.288 50.019,48.431 49.942,48.507 49.942,49.879 50.019,49.955 53.473,49.955 54.337,49.091 55.429,49.091 55.556,48.964 55.556,48.101 55.505,48.05 53.676,48.05 52.051,46.424 51.416,45.789 49.968,45.789 49.866,45.891 49.866,46.328
NetC6B_1 on Top Layer "NONET_L-01_P-001" (solid, pour order 57): 31.706,46.318 32.741,46.318 32.944,46.521 32.944,47.233 31.801,48.376 31.725,48.452 31.725,49.823 31.801,49.9 35.255,49.9 36.119,49.036 37.211,49.036 37.338,48.909 37.338,48.045 37.287,47.995 35.458,47.995 33.833,46.369 33.198,45.734 31.75,45.734 31.648,45.836 31.648,46.272
NetF1_1 on Top Layer "NONET_L-01_P-001" (solid, pour order 46): 0,84.045 0,67 22,67 22,83.955
NetC22_2 on Top Layer "NONET_L-01_P-001" (solid, pour order 55): 152.4,99.695 183.515,99.695 183.515,69.215 152.4,69.215
+VBAT on Top Layer "NONET_L-01_P-001" (solid, pour order 49): 13,102 34.29,102 34.29,67 23,67 23,87 13,87
GND on Bottom Layer "GND_L-01_P-001" (solid, remove dead copper, pour order 63): -0.457,125.279 -0.457,0.279 201.543,0.279 201.543,125.279
NetDA2_4 on Bottom Layer "NONET_L-01_P-001" (solid, pour order 54): 96.52,124.46 193.675,124.46 193.675,93.345 96.52,93.345
+V_BRIDGE on Bottom Layer "NONET_L-01_P-001" (solid, remove dead copper, pour order 50): 48.26,67.31 48.26,117.475 61.722,117.475 85.09,117.475 87.63,114.935 87.63,107.315 77.47,97.155 68.58,97.155 68.58,67.945 67.945,67.31 60.325,67.31
NetF1_1 on Bottom Layer "NONET_L-01_P-001" (solid, pour order 47): 0.508,84.043 0.508,67 22,67 22,83.955
NetR42_1 on Bottom Layer "NONET_L-01_P-001" (solid, pour order 52): 36,102 46,102 46,67 36,67
+VBAT on Bottom Layer "NONET_L-01_P-001" (solid, pour order 48): 13,102 34.29,102 34.29,67 23,67 23,87 13,87
no net on Bottom Solder "NONET_L-01_P-001" (solid): 97.155,123.825 97.155,93.98 193.04,93.98 193.04,123.825
no net on Bottom Solder "NONET_L-01_P-001" (solid): 14,101 33,101 33,68 24,68 24,88 14,88
no net on Bottom Solder "NONET_L-01_P-001" (solid, pour order 15): 37,101 45,101 45,68 37,68
no net on Bottom Solder "NONET_L-01_P-001" (solid, pour order 10): 84.455,116.84 48.895,116.84 48.895,67.945 67.945,67.945 67.945,97.79 77.47,97.79 86.995,107.315 86.995,114.3
no net on Bottom Solder "NONET_L-01_P-001" (solid, pour order 8): 1.27,83 21,83 21,67.945 1.27,68.002
no net on Top Solder "NONET_L-01_P-001" (solid): 153.035,69.85 182.88,69.85 182.88,99.06 153.035,99.06
no net on Top Solder "NONET_L-01_P-001" (solid): 93.98,69.85 93.98,72.39 117.475,95.885 117.475,99.06 120.65,99.06 144.78,99.06 144.78,87.63 127,69.85
+VBAT on Top Solder "NONET_L-01_P-001" (solid, pour order 16): 14,101 33,101 33,68 24,68 24,88 14,88
no net on Top Solder "NONET_L-01_P-001" (solid, pour order 14): 37,101 45,101 45,68 37,68

## Silkscreen, mask and mechanical layers (free items; w line width, h text height)
Top Overlay:
  text "12V" at 67.081,55.804 h1.52
Top Solder:
  text "Vitech-UA 2024.10 Kyiv" at 9.173,121.334 h2
  text "-" at 0.728,112.884 h2 r270
  text "CHRG" at 0.651,109.329 h2 r270
  text "+" at 0.626,100.057 h2 r270
  text "BAT -" at 188.857,86.503 h2
  text "BAT +" at 1.837,68.673 h2
  text "'.Product_Name'.'.Project_ID'.v'.Project_Version'" at 200,44.005 h2 r90
  text "N" at 199.9,39.4 h1.8 r90
  text "OUT" at 200,31.334 h2 r90
  text "L" at 199.9,28.4 h1.8 r90
  text "L" at 199.9,22.4 h1.8 r90
  text "TR" at 200,16.334 h2 r90
  text "N" at 199.9,13.4 h1.8 r90
  text "N" at 159.4,1.1 h1.8
  text "L" at 170.4,1.1 h1.8
  text "IN" at 163.5,1 h2
Board:
  lines w0.2: 0,0 0,125 202,125 202,0 0,0
  lines w0.254: 127,50 127,53.73 ; 184,50 184,53.73 ; 111,116 ccw(c111,116) 111,116 ; 111,116 ccw(c112,116) 112,115 183,115 ccw(c183,116) 184,116 184,121 ccw(c183,121) 183,122 182.73,122 144.73,122 112.27,122 ; 111,116 111,118 111,119.73 111,120.73 111,121 cw(c112,121) 112,122 112.27,122 ; 112.27,122 ccw(c112.27,122) 112.27,122 ; 92,48.27 ccw(c93.27,48.27) 93.27,47 125.73,47 ccw(c125.73,48.27) 127,48.27 127,54.73 ccw(c125.73,54.73) 125.73,56 93.27,56 ccw(c93.27,54.73) 92,54.73 92,53.73 92,52 92,50.27 92,48.27 ; 149,48.27 ccw(c150.27,48.27) 150.27,47 182.73,47 ccw(c182.73,48.27) 184,48.27 184,54.73 ccw(c182.73,54.73) 182.73,56 150.27,56 ccw(c150.27,54.73) 149,54.73 149,53.73 149,52 149,50.27 149,48.27
Top Assembly:
  text "PCB TOP VIEW" at 75.145,132 h2
Bottom Assembly:
  text "PCB BOTTOM VIEW" at 97.683,132 h2
Title:
  lines w0.1: 198.8,199.4 266.75,199.4
  lines w0.127: -44.879,10.002 -39.799,10.002 ; -44.879,80.487 -39.799,80.487 ; -44.879,150.972 -39.799,150.972 ; 4.397,-60.483 4.397,-55.403 ; 4.397,216.377 4.397,221.457 ; 53.546,-60.483 53.546,-55.403 ; 53.546,216.377 53.546,221.457 ; 102.695,-60.483 102.695,-55.403 ; 102.695,216.377 102.695,221.457 ; 151.971,-60.483 151.971,-55.403 ; 151.971,216.377 151.971,221.457 ; 194.725,-55.375 194.725,-25.375 343.725,-25.375 ; 194.725,-50.375 343.725,-50.375 ; 194.725,-45.375 343.725,-45.375 ; 194.725,-35.375 343.725,-35.375 ; 201.12,-60.483 201.12,-55.403 ; 201.12,216.377 201.12,221.457 ; 209.725,-45.375 209.725,-35.375 ; 250.269,-60.483 250.269,-55.403 ; 250.269,216.377 250.269,221.457 ; 279.725,-55.375 279.725,-45.375 ; 299.545,-60.483 299.545,-55.403 ; 299.545,216.377 299.545,221.457 ; 328.725,-45.375 328.725,-35.375 ; 343.741,10.002 348.821,10.002 ; 343.741,80.487 348.821,80.487 ; 343.741,150.972 348.821,150.972 ; -44.879,-60.483 348.821,-60.483 348.821,221.457 -44.879,221.457 -44.879,-60.483 ; -39.799,-55.403 343.741,-55.403 343.741,216.377 -39.799,216.377 -39.799,-55.403
  text "1" at -20.842,218.028 h1.78
  text "2" at 28.197,218.028 h1.78
  text "3" at 77.456,218.028 h1.78
  text "4" at 126.749,218.028 h1.78
  text "5" at 176.025,218.028 h1.78
  text "6" at 225.047,218.028 h1.78
  text "7" at 274.577,218.028 h1.78
  text "8" at 323.599,218.028 h1.78
  text "NOTES: UNLESS OTHERWISE SPECIFIED." at 200.2,200.45 h2.5
  text "1. MATERIAL:BASE MATERIAL LAMINATED EPOXY GLASS (ANY COLOR)" at 200.35,194.4 h2.5
  text "GRADE NEMA FR-4. ALL SIDES 1 OZ COPPER PER MIL-P-13949." at 206.95,189.9 h2.5
  text "AND IS UL APPROVED MFR SOURCE WITH 1.6 mm +-10 PERCENT" at 206.95,186.2 h2.5
  text "A" at -42.974,184.043 h1.78
  text "A" at 345.646,184.043 h1.78
  text "2. SOLDER PLATE PER QQ-S-571." at 200.35,181.9 h2.5
  text "3. SILKSCREEN IS ABSENT." at 200.35,177.9 h2.5
  text "4. DIMENSIONS IN MILLIMETERS, (...) - FOR REFERENCE," at 200.3,173 h2.5
  text "TOLERANCE ARE: +-0.15; HOLES: +- 0.05." at 207.45,168.95 h2.5
  text "5. LIQUID PHOTO IMAGABLE SOLDERMASK ENTHRONE DSR3241" at 200.35,164.9 h2.5
  text "OR ALTERNATIVE." at 207.45,160.95 h2.5
  text "6.  FOR REF ONLY: THIS BOARD HAS SMD ON BOTH SIDES." at 200.35,156.9 h2.5
  text "7.  THE FINISH OF THE BOARD IS HASL." at 200.2,150.5 h2.5
  text "8. PCB stackup:" at 200.2,144.8 h2.5
  text "B" at -42.974,113.431 h1.78
  text "B" at 345.646,113.431 h1.78
  text "C" at -42.974,42.819 h1.78
  text "C" at 345.646,42.819 h1.78
  text "D" at -42.974,-27.285 h1.78
  text "D" at 345.646,-27.285 h1.78
  text "TITLE:" at 195.7,-27.8 h1.2
  text "SIZE:" at 195.7,-37.55 h1.2
  text "DWG NO:" at 210.7,-37.55 h1.2
  text "REV:" at 330.2,-37.55 h1.2
  text ".Project_Version" at 335.4,-38.7 h2.5
  text "A3" at 201.7,-42.3 h2.5
  text "DATE:" at 195.7,-47.55 h1.2
  text "PCB DESIGNER:" at 281.2,-47.55 h1.2
  text ".PRINT_DATE" at 209.2,-48.8 h2.5
  text "FILE NAME:" at 195.7,-52.55 h1.2
  text "SHEET:" at 280.95,-52.55 h1.2
  text ".PCB_FILE_NAME_NO_PATH" at 209.2,-53.8 h2.5
  text "1 OF 1" at 298.95,-54.05 h2.5
  text "1" at -20.842,-58.832 h1.78
  text "2" at 28.197,-58.832 h1.78
  text "3" at 77.456,-58.832 h1.78
  text "4" at 126.749,-58.832 h1.78
  text "5" at 176.025,-58.832 h1.78
  text "6" at 225.047,-58.832 h1.78
  text "7" at 274.577,-58.832 h1.78
  text "8" at 323.599,-58.832 h1.78
Dimensions:
  lines w0.254: 82.471,38 136.471,38 136.471,80 82.471,80 82.471,38 ; 102.802,83.058 193.802,83.058 193.802,125.058 102.802,125.058 102.802,83.058 ; 139.802,38.01 193.802,38.01 193.802,80.01 139.802,80.01 139.802,38.01
  text "DIMENSIONS" at 77.421,132 h2

## Dimensions
87,52 to 132,52 on Dimensions
144,52 to 189,52 on Dimensions
189,67 to 189,52 on Dimensions
189,118 to 189,97 on Dimensions
107,117 to 189,118 on Dimensions
139.802,38.01 to 193.802,38.01 on Dimensions
102.802,125.058 to 193.802,125.058 on Dimensions
193.802,125.058 to 193.802,83.058 on Dimensions
193.802,80.01 to 193.802,38.01 on Dimensions
202,0 to 0,0 on Dimensions
0,0 to 0,125 on Dimensions